# Altium PCB BIOS Deck Lite.PcbDoc
Units mil, origin at the board's own origin, x right, y up, seen from the top; angles counter-clockwise.
Board outline 1375 x 2000 mil, 2 copper layers (Top Layer, Bottom Layer); 20 components, 23 nets, 66 pads, 2 vias.
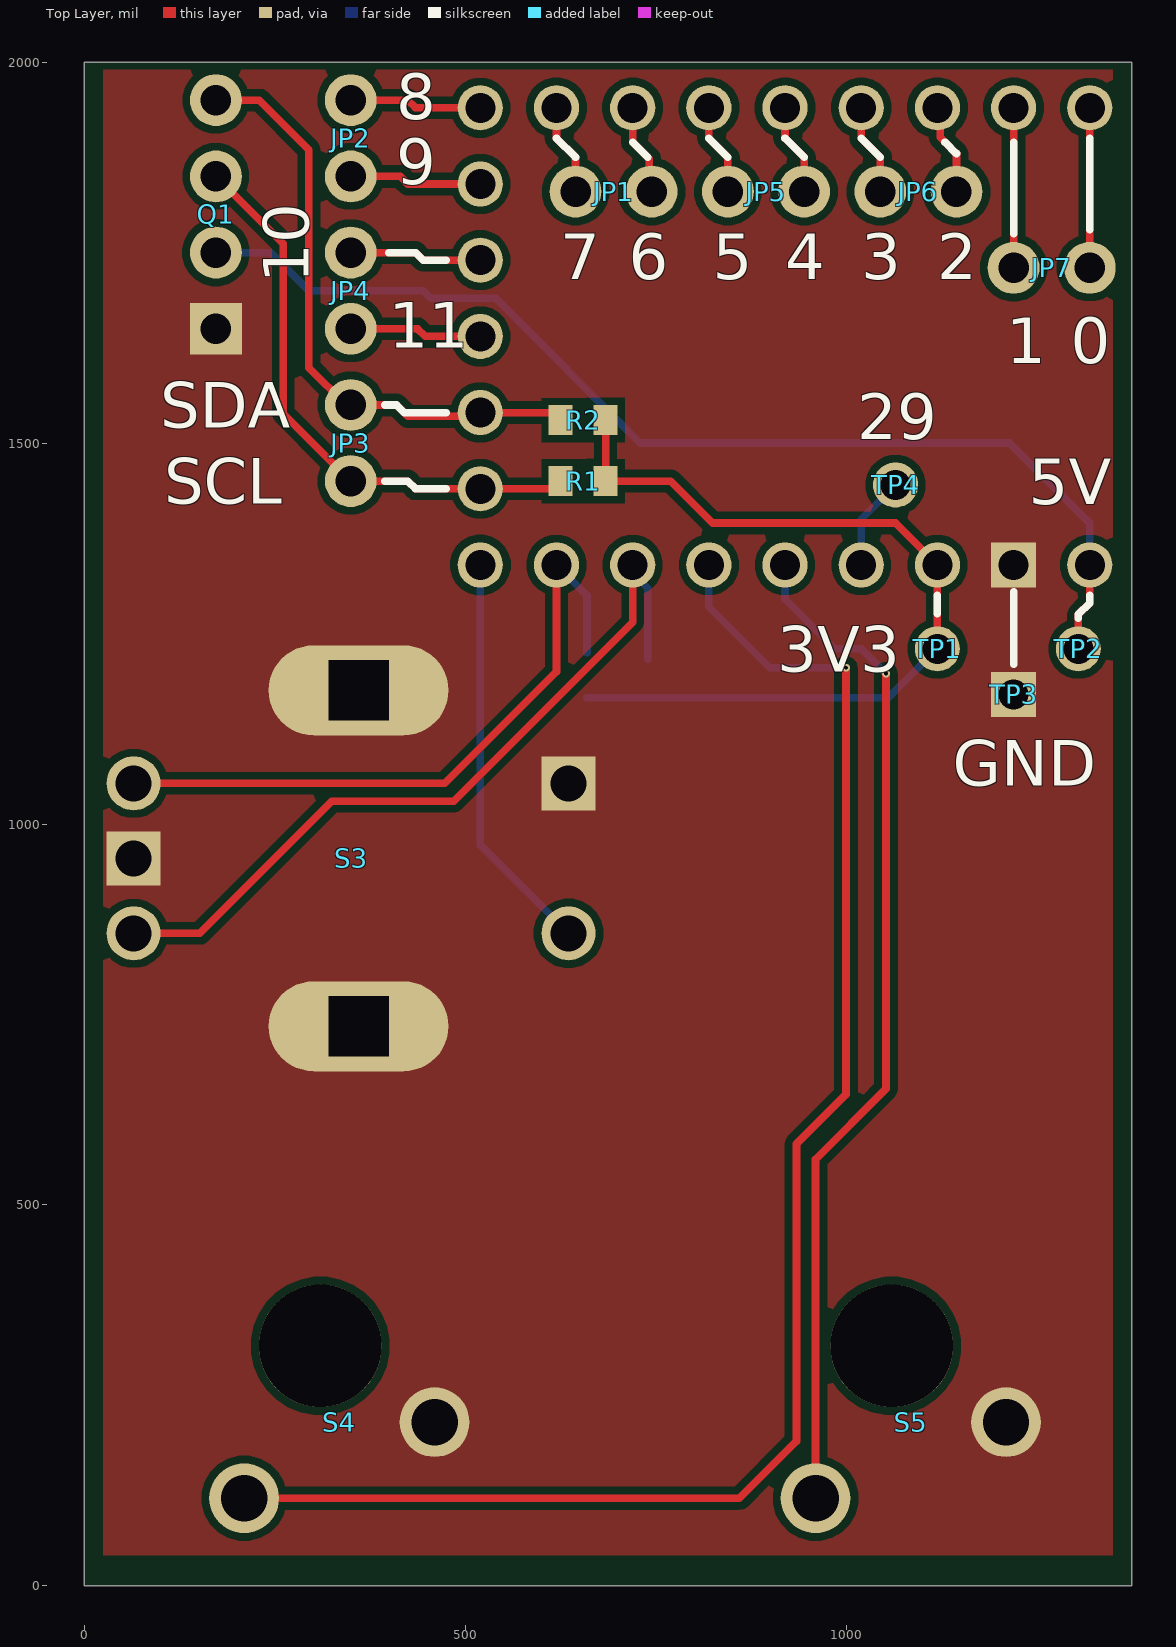
[diagram p0: Top Layer view]
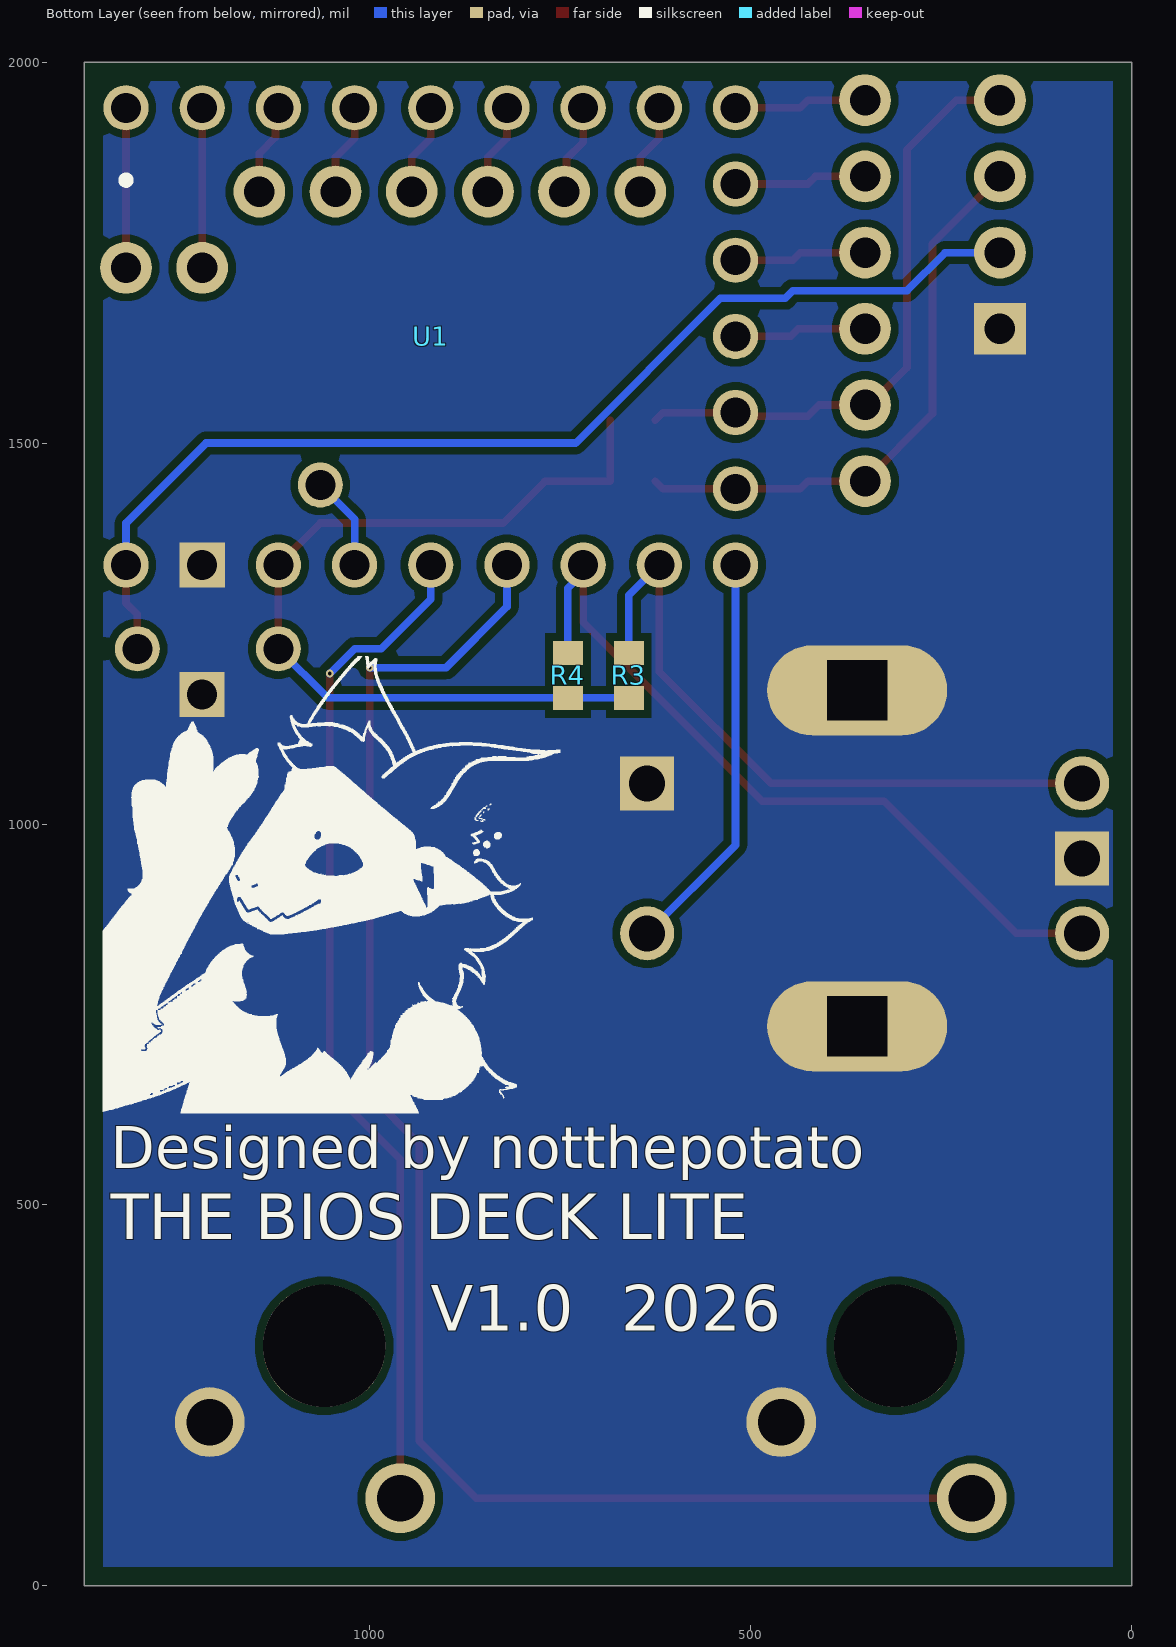
[diagram p1: Bottom Layer view, seen from below]
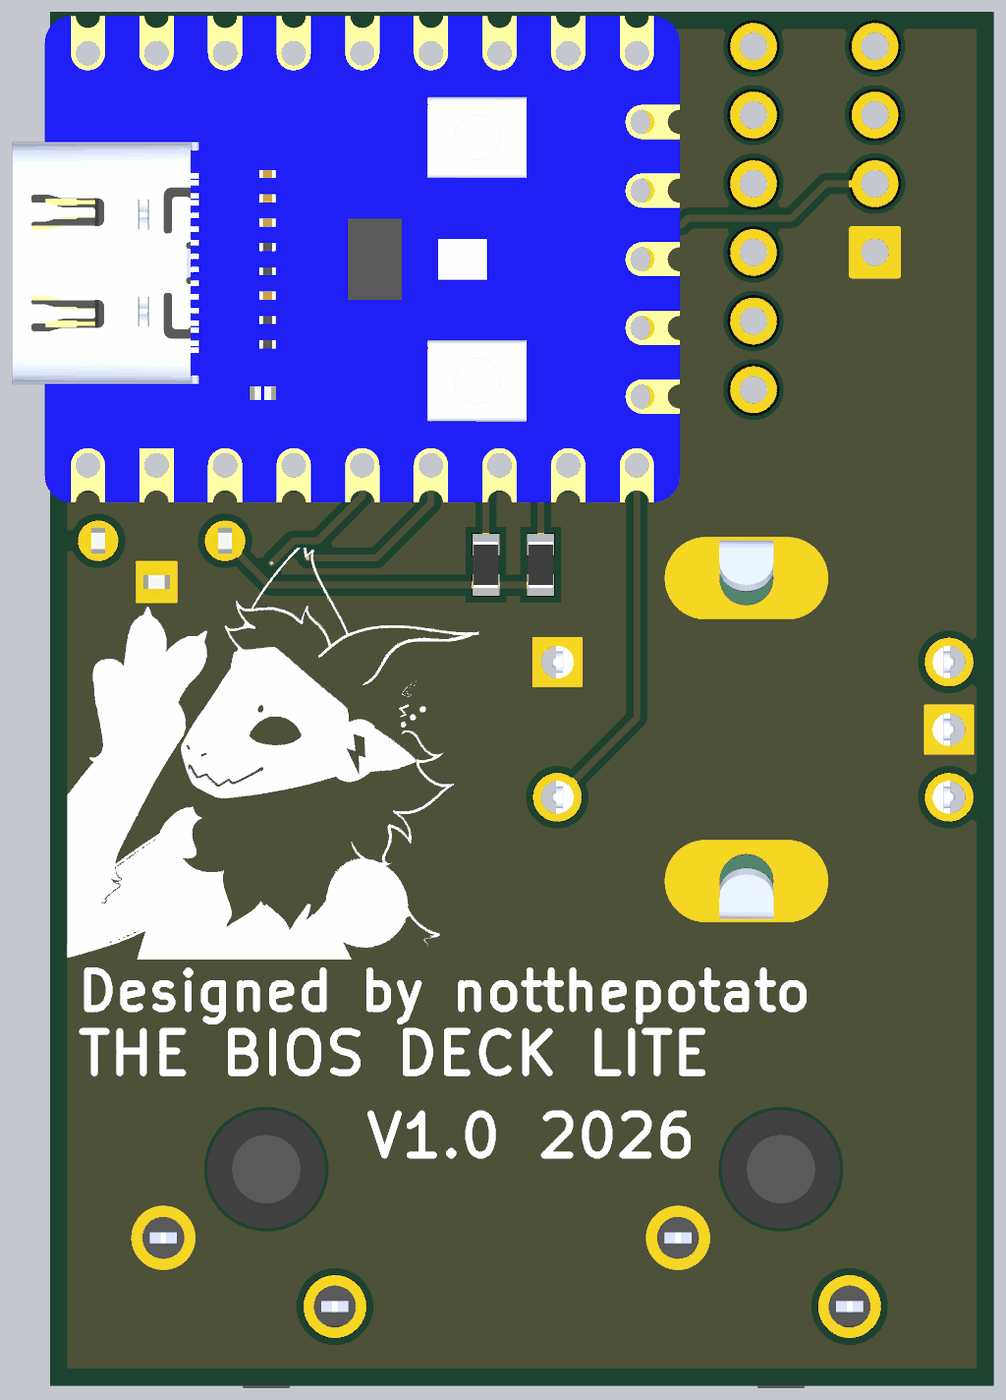
[diagram p2: 3D render of the assembled board from below, using the file's embedded part models]

## Layer stack, top to bottom
Top Solder: solder mask 0.4, Solder Resist, Dk 3.5
Top Layer: signal copper 1.4
Dielectric1: dielectric 12.6, FR-4, Dk 4.8
Bottom Layer: signal copper 1.4
Bottom Solder: solder mask 0.4, Solder Resist, Dk 3.5

## Board outline
0,0 1375,0 1375,2000 0,2000

## Design rules (kind name [scope] priority, off if disabled: settings)
Clearance Polygon [InPolygon] p1: gap=10 ignorepadtopadclearanceinfootprint=TRUE
Clearance [All] p2: gap=10 ignorepadtopadclearanceinfootprint=FALSE except(0: Arc-Hole Track-Hole SMDPad-Hole THPad-Hole Via-Hole Fill-Hole Poly-Hole Region-Hole Text-Hole)
ComponentClearance [All] p1 off: gap=10 collisioncheckmode=3 verticalgap=10 showdistances=FALSE
FabricationTestPointUsage TestPointUsage [All] p1: valid=0 allowmultiple=FALSE
FabricationTestpoint Testpoint [All] p1: side=3 testpointundercomponent=TRUE minsize=40 maxsize=100 preferedsize=60 minholesize=0 maxholesize=40 preferedholesize=32 testpointgrid=1 allowsidetop=TRUE allowsidebottom=TRUE usegrid=TRUE gridtolerance=0.01
HoleSize [All] p1: absolutevalues=TRUE maxlimit=248.03 minlimit=11.81 maxpercent=80.000 minpercent=20.000
PolygonConnect [All] p1: connectstyle=Direct reliefconductorwidth=10 reliefentries=4 polygonreliefangle="90 Angle" airgapwidth=10
RoomDefinition "BIOS Deck Lite" [InComponentClass('BIOS Deck Lite')] p1: confinementstyle=ConfineIn formatcopy=TRUE lockcomponents=FALSE outline -7500,-15000 -5500,-15000 -5500,-14000 -7500,-14000
RoutingVias [All] p1: holewidth=15 width=29 viastyle="Through Hole" minholewidth=12 minwidth=26 maxholewidth=20 maxwidth=35
SilkToSolderMaskClearance SilkscreenOverComponentPads [IsPad] p1: minsilkscreentomaskgap=10 clearancetoexposedcopper=TRUE
SolderMaskExpansion [All] p1: expansion=1 istentingtop=FALSE
SupplyNets "Schematic Supply Nets_4" [InNet('3V3')] p1: voltage=0.000
SupplyNets "Schematic Supply Nets_2" [InNet('5V')] p2: voltage=0.000
SupplyNets "Schematic Supply Nets_1" [InNet('GND')] p3: voltage=0.000
Width [All] p1: maxlimit=100 minlimit=8 preferedwidth=10
25 further rules are at their usual default settings.

## Components (designator, comment, footprint, x,y, rotation, side; value= is the part's Value field where it differs from the comment)
JP1 "Header 2" "Header 2-Footprint-1" 695,1830 r0 top
JP2 "Header 2" "Header 2-Footprint-1" 350,1900 r90 top
JP3 "Header 2" "Header 2-Footprint-1" 350,1500 r90 top
JP4 "Header 2" "Header 2-Footprint-1" 350,1700 r90 top
JP5 "Header 2" "Header 2-Footprint-1" 895,1830 r0 top
JP6 "Header 2" "Header 2-Footprint-1" 1095,1830 r0 top
JP7 "Header 2" "Header 2-Footprint-1" 1270,1730 r0 top
Q1 "0.9-OLED" "New footprint 2" 173,1800 r0 top
R1 "Resistor 10k +/-1% 0603 100 mW" RESC1608X55X25ML10T15 655,1450 r0 top value=1k
R2 "Resistor 10k +/-1% 0603 100 mW" RESC1608X55X25ML10T15 655,1530 r0 top value=1k
R3 "Resistor 10k +/-1% 0603 100 mW" RESC1608X55X25ML10T15 660,1195 r270 bottom value=10k
R4 "Resistor 10k +/-1% 0603 100 mW" RESC1608X55X25ML10T15 740,1195 r270 bottom value=10k
S3 "PEC12R-4230F-S0024" XDCR_PEC12R-4230F-S0024 360.28,955 r270 top
S4 "MX1A-11NN" SW_MX1A-11NN 310,315 r180 top
S5 "MX1A-11NN" SW_MX1A-11NN 1060,315 r180 top
TP1 "5003" KSTN-5003#1 1120,1230 r90 top
TP2 "5003" KSTN-5003#1 1305,1230 r90 top
TP3 "5003" KSTN-5003#2 1220,1170 r0 top
TP4 "5003" KSTN-5003#1 1065,1445 r0 top
U1 "RP2040-ZERO" MODULE_RP2040-ZERO 920,1640 r90 bottom

## Footprints (in the part's own frame and the unit in brackets; to place one, negate y for a bottom-side part, rotate by r counter-clockwise, add the part's x,y. Pads: shape width x height; smd on the part's side, far side on the other; paste and mask are expansions set on the pad)
"Header 2-Footprint-1" [mil]
  round 68 hole 40 mask+4: 1(50,0) 2(-50,0)
KSTN-5003#1 [mm] "Test Point, Through Hole, Dia 2.54mm"
  round 1.5 hole 1: 1(0,0)
  body extent -1.27,-1.27 1.27,1.27, height 4.57
KSTN-5003#2 [mm] "Test Point, Through Hole, Dia 2.54mm"
  rect 1.5x1.5 hole 1: 1(0,0)
  body extent -1.27,-1.27 1.27,1.27, height 4.57
MODULE_RP2040-ZERO [mm]
  round 1.508 hole 1: 1(7.62,10.16) 2(7.62,7.62) 3(7.62,5.08) 4(7.62,2.54) 5(7.62,0) 6(7.62,-2.54) 7(7.62,-5.08) 8(7.62,-7.62) 9(7.62,-10.16) 10(5.08,-10.16) 11(2.54,-10.16) 12(0,-10.16) 13(-2.54,-10.16) 14(-5.08,-10.16) 15(-7.62,-10.16) 16(-7.62,-7.62) 17(-7.62,-5.08) 18(-7.62,-2.54) 19(-7.62,0) 20(-7.62,2.54) 21(-7.62,5.08) 23(-7.62,10.16)
  rect 1.508x1.508 hole 1: 22(-7.62,7.62)
  body extent -9,-11.75 9,12.95, height 4.35
"New footprint 2" [mil]
  round 68 hole 40 mask+4: 1(0,150) 2(0,50) 3(0,-50)
  rect 68x68 hole 40 mask+4: 4(0,-150)
RESC1608X55X25ML10T15 [mm] "Chip Resistor, 2-Leads, Body 1.70x0.90mm, IPC Low Density"
  rect 0.8x1 smd: 1(-0.75,0) 2(0.75,0)
  body extent -0.85,-0.45 0.85,0.45, height 0.55
SW_MX1A-11NN [mil]
  round 91.5 hole 61: 1(-150,100) 2(100,200)
  round 161 hole 161 unplated: ""(0,0)
  body extent -305,-319 305,319, height 600
XDCR_PEC12R-4230F-S0024 [mm]
  rect 1.8x1.8 / inner round 1.8 / far side rect 1.8x1.8 hole 1.2: 1(-2.5,7)
  round 1.8 hole 1.2: 2(2.5,7) A(-2.5,-7.5) B(2.5,-7.5)
  rect 1.8x1.8 hole 1.2: C(0,-7.5)
  oval 3x6 hole 2 square: SH1(-5.6,0) SH2(5.6,0)
  body extent -7,-7.7 7,7.2, height 30

## Part data
JP1 JP2 JP3 JP4 JP5 JP6 JP7: library part CMP-002-00072-6, "Header Pin 2x1"
Q1: library part CMP-00002-1, "0.9\" OLED"
R1 R2 R3 R4: library part CMP-009-00017-5, "Chip Resistor, 10 KOhm, +/- 1%, 01 W, -55 to 155 degC, 0603 (1608 Metric)", Case/Package=0603, Max Operating Temperature=155°C, Min Operating Temperature=-55°C, Power=100mW, Tolerance=1%, Voltage Rating=50V, Mounting Technology=SM, Pins=2, RoHS Compliant=True
S3: library part PEC12R-4230F-S0024-000002-1, "24 Pulse Incremental Mechanical Rotary Encoder w/ 6 mm Flat Shaft,Through Hole", Package=None, Check_prices=https://www.snapeda.com/parts/PEC12R-4230F-S0024/Bourns/view-part/?ref=eda, Component Type=Standard, Design Item ID=PEC12R-4230F-S0024, MF=Bourns, MP=PEC12R-4230F-S0024, Pin Count=7, SnapEDA_Link=https://www.snapeda.com/parts/PEC12R-4230F-S0024/Bourns/view-part/?ref=snap, Source=PEC12R-4230F-S0024.SchLib
S4 S5: library part CMP-011-00014-1, "Switch,Key,SPST-NO,Keyboard,Low Profile,10mA,12VDC,Face Place Mount,Std Force", Case/Package=None, Check_prices=https://www.snapeda.com/parts/MX1A-11NN/Cherry/view-part/?ref=eda, Component Type=Standard, Design Item ID=MX1A-11NN, MF=Cherry, MP=MX1A-11NN, Pins=2, SnapEDA_Link=https://www.snapeda.com/parts/MX1A-11NN/Cherry/view-part/?ref=snap, Source=MX1A-11NN.SchLib
TP1 TP2 TP3 TP4: library part CMP-002-00037-2, "Test Point, Orange, Height 4.6 mm, Tail Length 3 mm, 1-Pin THD, RoHS", Colour=Orange, Manufacturer=Keystone, Package Description="1-Pin Through Hole Device, Dia 2.54 mm", Package Quantity=10, Case/Package=5003, Connector Type=TestPoint, Contact Material=Bronze, Contact Plating=Tin, Datasheet URL=http://keyelco.com/userAssets/file/M65p56.pdf, Datasheet Version=Jun-15, Diameter=2.54mm, Manufacturer URL=http://www.keyelco.com/, Mounting Technology=TH, Package Reference=5003, Packaging=Bulk, Pins=1, RoHS Compliant=True
U1: "Low-Cost, High-Performance Pico-Like MCU Board Based On Raspberry Pi Microcontroller RP2040", Package=Package, Check_prices=https://www.snapeda.com/parts/RP2040-ZERO/Waveshare+Electronics/view-part/?ref=eda, MF="Waveshare Electronics", MP=RP2040-ZERO, SnapEDA_Link=https://www.snapeda.com/parts/RP2040-ZERO/Waveshare+Electronics/view-part/?ref=snap

## Via types
v1: diameter 10, hole 5, Top Layer to Bottom Layer, tented both sides, 2 vias

## Nets (pads, with @x,y where several pads share a name; then routed paths per layer and width w, separated by ;. In a path a pad name is that pad's centre, name@x,y a point inside that pad or via, vN(x,y) a via of type N, cw(c..) or ccw(c..) an arc to the next point about the centre after c; other vN are vias at no path point)
3V3: R1.2 R2.2 R3.2 R4.2 TP1.1 U1.21 | length 1157.8
  Top Layer w10: R2.2 R1.2 770,1450 825,1395 1065,1395 U1.21 TP1.1
  Bottom Layer w10: R3.2 1055.47,1165.47 TP1.1
5V: Q1.3 TP2.1 U1.23 | length 1465.3
  Top Layer w10: TP2.1 1305,1275 1320,1290 U1.23
  Bottom Layer w10: Q1.3 245,1750 295,1700 445,1700 455,1690 540,1690 730,1500 1215,1500 1320,1395 U1.23
BTN_0: S4.2 U1.18 | length 2066.1
  Top Layer w10: S4.2 860,115 935,190 935,580 1000,645 v1(1000,1205)
  Bottom Layer w10: U1.18 820,1285 900,1205 v1(1000,1205)
BTN_1: S5.2 U1.19 | length 1338.7
  Top Layer w10: S5.2 960,560 1052.5,652.5 v1(1052.5,1197.5)
  Bottom Layer w10: U1.19 920,1295 985,1230 1020,1230 v1(1052.5,1197.5)
ENC_CLK: R3.1 S3.A U1.16 | length 887.8
  Top Layer w10: S3.A 473.43,1053.43 620,1200 U1.16
  Bottom Layer w10: U1.16 660,1300 R3.1
ENC_DT: R4.1 S3.B U1.17 | length 1031.5
  Top Layer w10: S3.B 151.57,856.57 325,1030 485,1030 720,1265 U1.17
  Bottom Layer w10: U1.17 720,1329.46 740,1309.46 R4.1@740,1215.99
ENC_SWT: S3.2 U1.15 | length 531.4
  Bottom Layer w10: U1.15 520,972.44 S3.2
GND: Q1.4 S3.1 S3.C S3.SH1 S3.SH2 S4.1 S5.1 TP3.1 U1.22
IO10: JP4.1 U1.11 | length 174.1
  Top Layer w10: JP4.1 435,1750 445,1740 U1.11
IO11: JP4.2 U1.12 | length 174.1
  Top Layer w10: JP4.2 437.56,1650 447.56,1640 U1.12
NetJP1_1: JP1.1 U1.7 | length 120.4
  Top Layer w10: U1.7 720,1895 741.86,1873.14 741.86,1833.14 JP1.1
NetJP1_2: JP1.2 U1.8 | length 120.4
  Top Layer w10: U1.8 620,1900 645,1875 JP1.2
NetJP2_1: JP2.1 U1.9 | length 174.1
  Top Layer w10: JP2.1 425,1950 435,1940 U1.9
NetJP2_2: JP2.2 U1.10 | length 174.1
  Top Layer w10: JP2.2 415,1850 425,1840 U1.10
NetJP5_1: JP5.1 U1.5 | length 120.4
  Top Layer w10: U1.5 920,1900 945,1875 JP5.1
NetJP5_2: JP5.2 U1.6 | length 120.4
  Top Layer w10: U1.6 820,1900 845,1875 JP5.2
NetJP6_1: JP6.1 U1.3 | length 120.4
  Top Layer w10: U1.3 1123.83,1936.17 1123.83,1901.17 1145,1880 JP6.1
NetJP6_2: JP6.2 U1.4 | length 120.4
  Top Layer w10: U1.4 1020,1900 1045,1875 JP6.2
NetJP7_1: JP7.1 U1.1 | length 210
  Top Layer w10: JP7.1 U1.1
NetJP7_2: JP7.2 U1.2 | length 212.1
  Top Layer w10: U1.2 1220,1735 JP7.2@1225,1730
NetTP4_1: TP4.1 U1.20 | length 123.6
  Bottom Layer w10: U1.20 1020,1400 TP4.1
SCL: JP3.2 Q1.2 R1.1 U1.14 | length 757.1
  Top Layer w10: Q1.2 261.5,1761.5 261.5,1538.5 JP3.2 425,1450 435,1440 U1.14 615.47,1440 R1.1
SDA: JP3.1 Q1.1 R2.1 U1.13 | length 798
  Top Layer w10: Q1.1 230,1950 295,1885 295,1599.13 344.13,1550 410,1550 425,1535 515,1535 U1.13 615.47,1540 R2.1
pads on no net: S4. S5.

## Polygon pours and split planes (outlines as drawn)
GND on Bottom Layer "GND_L02_P000" (solid, pour order 0): 25,1975 1350,1975 1350,25 25,25
GND on Top Layer "GND_L01_P001" (solid, pour order 1): 25,1990 1350,1990 1350,40 25,40

## Silkscreen, mask and mechanical layers (free items; w line width, h text height)
Top Overlay:
  lines w10: 395,1450 425,1450 435,1440 475,1440 ; 395,1550 410,1550 420,1540 470,1540 475,1540 ; 400,1750 435,1750 445,1740 475,1740 ; 620,1900 645,1875 ; 720,1895 740,1875 ; 820,1900 845,1875 ; 920,1900 945,1875 ; 1020,1900 1045,1875 ; 1120,1275.83 1120,1300 ; 1130,1895 1145,1880 ; 1220,1210 1220,1305 ; 1220,1775 1220,1895 ; 1305,1270 1305,1275 1320,1290 1320,1300 ; 1320,1780 1320,1900
  text "8" at 410,1925 h60
  text "9" at 410,1840 h60
  text "7" at 625,1715 h60
  text "6" at 715,1715 h60
  text "5" at 825,1715 h60
  text "4" at 920,1715 h60
  text "3" at 1020,1715 h60
  text "2" at 1120,1715 h60
  text "10" at 295,1710 h60 r90
  text "11" at 400,1625 h60
  text "1" at 1210,1605 h60
  text "0" at 1295,1605 h60
  text "SDA" at 100,1520.01 h60
  text "29" at 1015,1505 h60
  text "SCL" at 105,1420.01 h60
  text "5V" at 1240,1420 h60
  text "3V3" at 910,1200.01 h60
  text "GND" at 1140.03,1050 h60
Bottom Overlay:
  drawing of 25 lines, arcs and shapes, not listed
  text "Designed by notthepotato" at 1340,548.33 h55
  text "THE BIOS DECK LITE" at 1340,455 h60
  text "2026" at 670,335 h60
  text "V1.0" at 920,335 h60
M1 board outline:
  the board outline again, w10
M3 routing:
  text "2 x 3 panel, with 0.3 in. strips on the top and bottom edges;" at 3200,-700 h80
  text "four 3mm tooling pin holes;" at 3300,-900 h80
  text "0.3 in. strip between rows;" at 3300,-1100 h80
  text "four 0.04 in. diameter fiducial marks on both front and back" at 3300,-1300 h80
  text "Outside dimensions 5.55 in. x 7.5 in." at 3200,-1500 h80
  text "Rout left and right board edges;" at 3200,-1700 h80
  text "V-score top and bottom board edges" at 3300,-1900 h80

## Dimensions
0,0 to 0,2000 on M1 board outline
1375,2000 to 0,0 on M1 board outline